# Altium PCB AIR_SENSE.PcbDoc
Units mm, origin at the board's own origin, x right, y up, seen from the top; angles counter-clockwise.
Board outline 108 x 60 mm, 2 copper layers (Top, Bottom), stack 1.471 mm thick; 19 components, 15 nets, 105 pads, 18 vias.
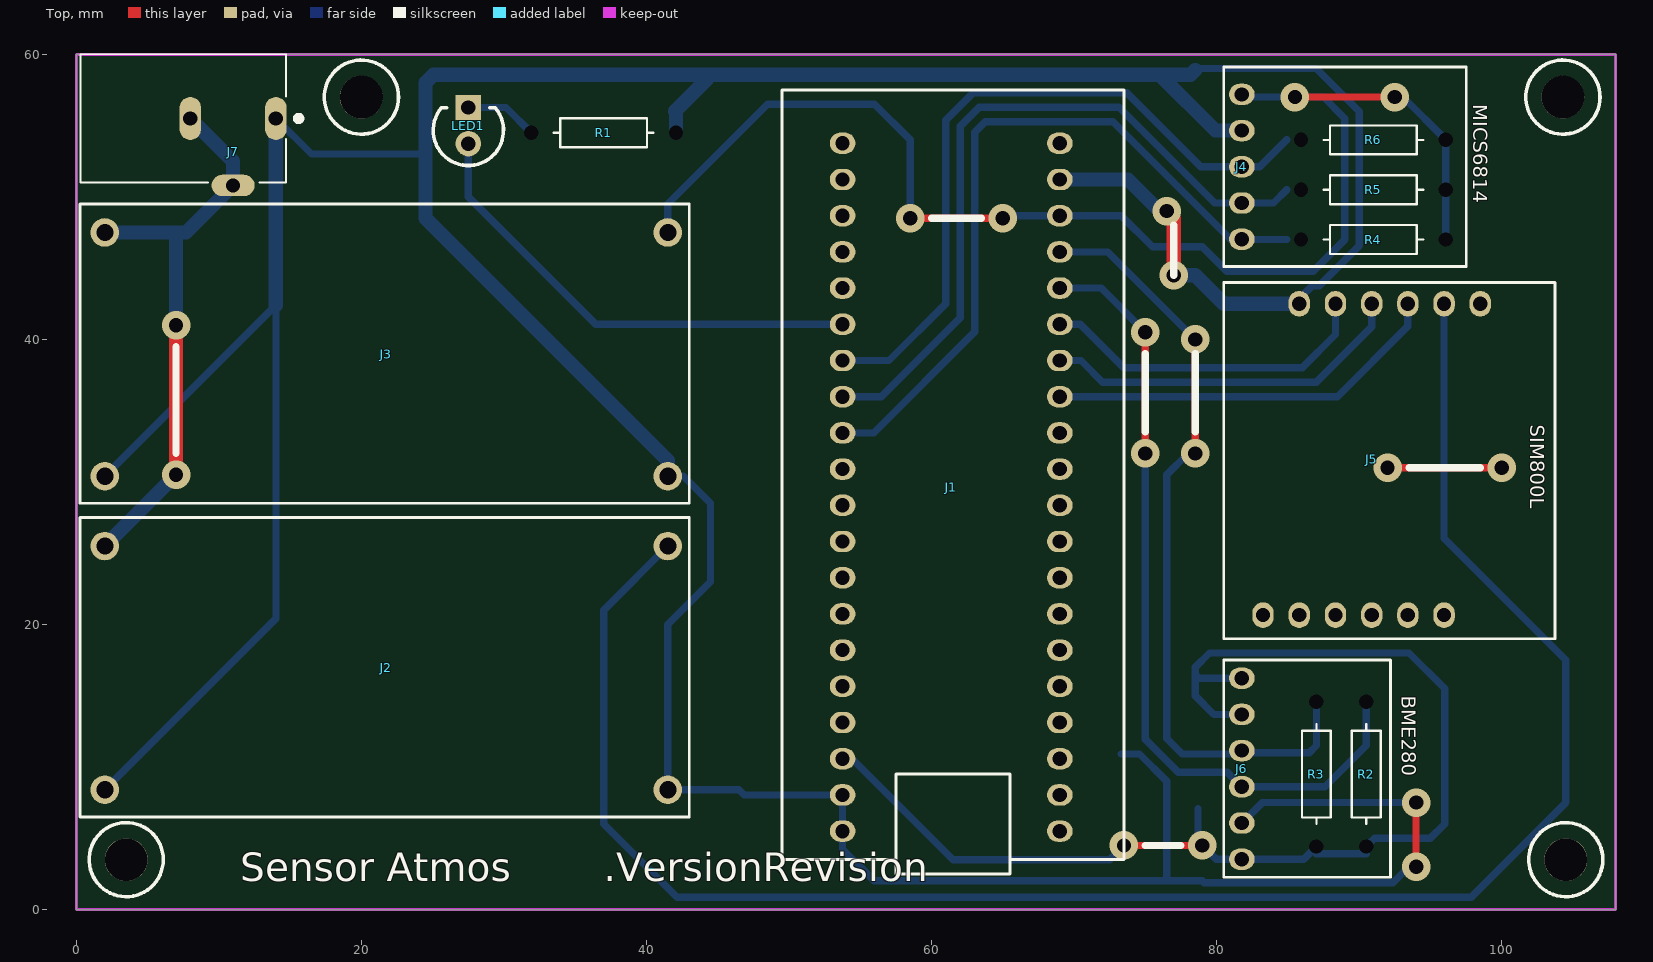
[diagram p0: Top view]
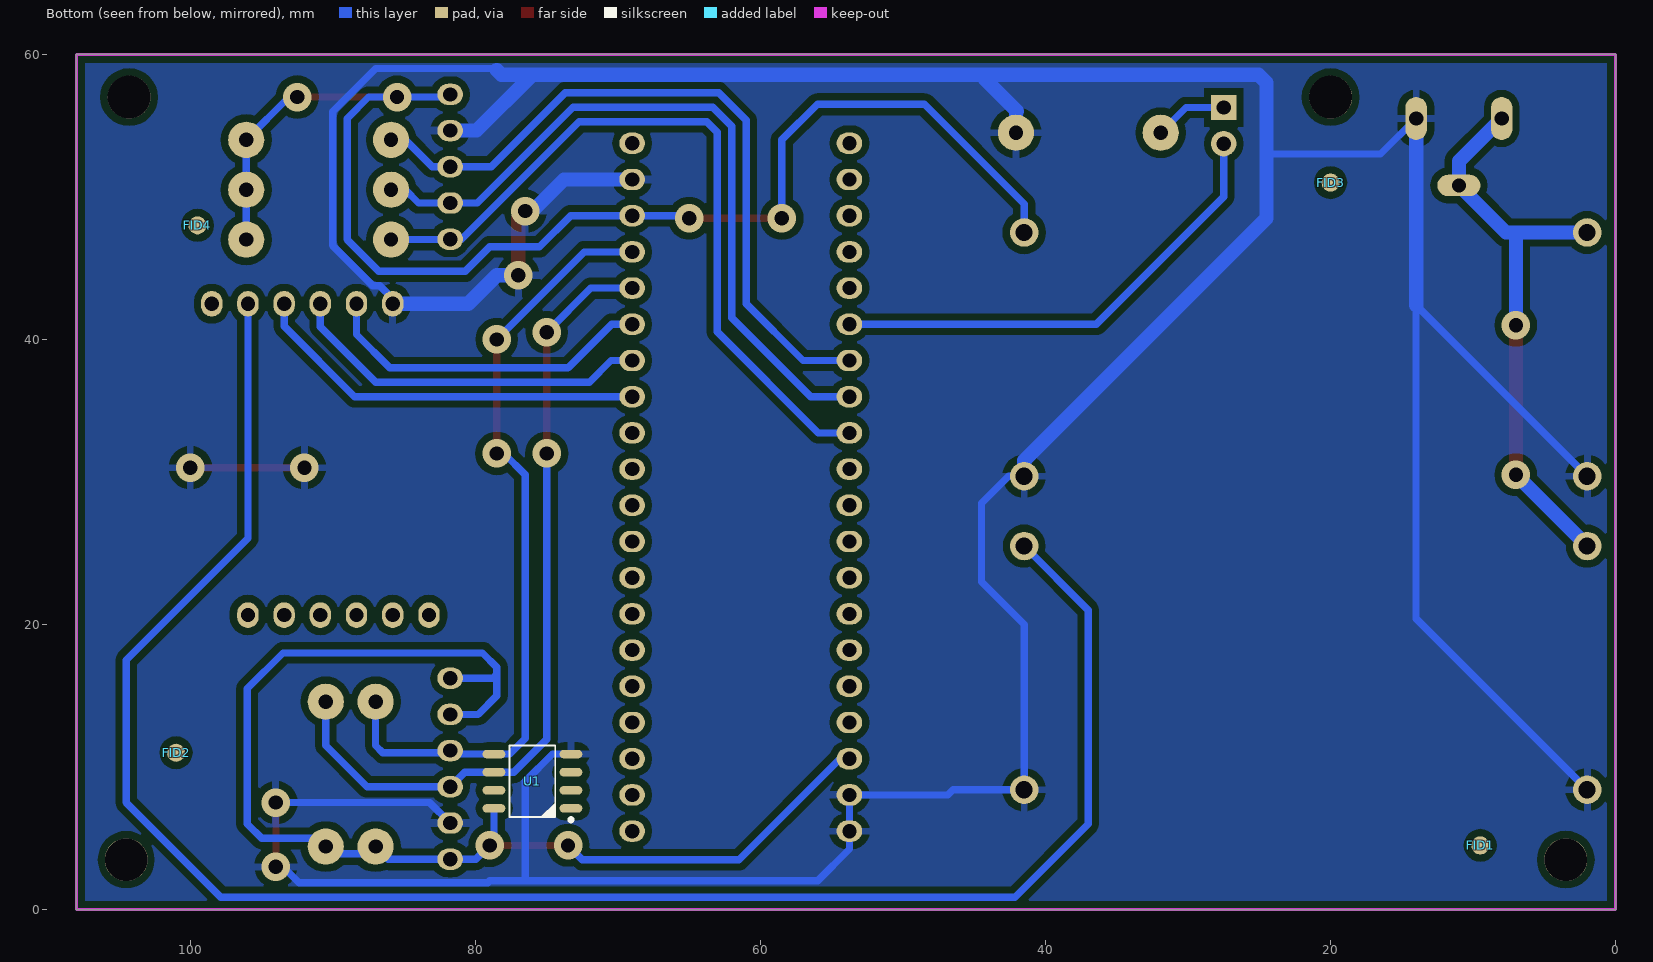
[diagram p1: Bottom view, seen from below]

## Layer stack, top to bottom
Top Solder: solder mask 0.0102, Solder Resist, Dk 3.5
Top: signal copper 0.0356
Dielectric1: dielectric 1.4, FR-4, Dk 4.8
Bottom: signal copper 0.0356
Bottom Solder: solder mask 0.0102, Solder Resist, Dk 3.5

## Board outline
0,0 108,0 108,60 0,60

## Design rules (kind name [scope] priority, off if disabled: settings)
Clearance [All] p1: gap=0.508
HoleSize [All] p1: absolutevalues=TRUE maxlimit=5 minlimit=1 maxpercent=80.000 minpercent=20.000
PolygonConnect [All] p1: connectstyle=Relief reliefconductorwidth=0.508 reliefentries=4 polygonreliefangle="90 Angle" airgapwidth=0.508
RoutingVias [All] p1: holewidth=0.711 width=1.27 viastyle="Through Hole" minholewidth=0.711 minwidth=1.27 maxholewidth=0.711 maxwidth=1.27
SilkToSolderMaskClearance SilkscreenOverComponentPads [IsPad] p1: minsilkscreentomaskgap=0 clearancetoexposedcopper=TRUE
SolderMaskExpansion [All] p1: expansion=0.102
Width [All] p1: maxlimit=2 minlimit=0.254 preferedwidth=1
28 further rules are at their usual default settings.

## Components (designator, comment, footprint, x,y, rotation, side; value= is the part's Value field where it differs from the comment)
FID1 "FIDUCIAL" "FIDUCIAL - 1.27mm" 9.5,4.5 r90 bottom
FID2 "FIDUCIAL" "FIDUCIAL - 1.27mm" 101,11 r90 bottom
FID3 "FIDUCIAL" "FIDUCIAL - 1.27mm" 20,51 r90 bottom
FID4 "FIDUCIAL" "FIDUCIAL - 1.27mm" 99.5,48 r90 bottom
J1 "MODULE BLUE PILL SOCKET" "MODULE BLUE PILL SOCKET" 69,5.5 r90 top
J2 "XL6009" "MODULE DC-DC XL6009 SOCKET" 2,25.5 r0 top
J3 "XL6009" "MODULE DC-DC XL6009 SOCKET" 2,47.5 r0 top
J4 "MODULE MICS6814 SOCKET" "MODULE MICS6814 SOCKET" 80.5,61 r0 top
J5 "MODULE SIM800L SOCKET" "MODULE SIM800L SOCKET" 98.5,42.5 r270 top
J6 "Socket" "MODULE BME280 SOCKET" 80.5,17.5 r0 top
J7 "PJ-102BH" CUI_PJ-102BH 7.5,55.5 r180 top
LED1 "LED_RED_3MM_PTH" LED-3MM-RED 27.5,55 r0 top
R1 "Carbon Film" RESTH_AXIAL-0.4 37,54.5 r180 top
R2 "Carbon Film" RESTH_AXIAL-0.4 90.5,9.5 r270 top
R3 "Carbon Film" RESTH_AXIAL-0.4 87,9.5 r270 top
R4 "Carbon Film" RESTH_AXIAL-0.4 91,47 r0 top
R5 "Carbon Film" RESTH_AXIAL-0.4 91,50.5 r0 top
R6 "Carbon Film" RESTH_AXIAL-0.4 91,54 r0 top
U1 "Authentication Chip" SOIC127P600X175-8AN 76,9 r0 bottom

## Footprints (in the part's own frame and the unit in brackets; to place one, negate y for a bottom-side part, rotate by r counter-clockwise, add the part's x,y. Pads: shape width x height; smd on the part's side, far side on the other; paste and mask are expansions set on the pad)
CUI_PJ-102BH [mm]
  oval 1.508x3.016 hole 1: 1(-6.5,0) 2(-0.5,0)
  oval 3.016x1.508 hole 1: 3(-3.5,4.7)
  silkscreen extent -8.3,-4.5 7.2,4.5, body extent -7.2,-4.5 7.2,4.9, height 11.5
"FIDUCIAL - 1.27mm" [mm]
  round 1.27 smd: Fiducial(0,0)
LED-3MM-RED [mil] "LED 3MM PTH"
  round 70 hole 39.37: A(0,-50)
  rect 70x70 hole 39.37: K(0,50)
  silkscreen extent -97,-110 97,49, body extent -65,-66 65,61, height 196
"MODULE BLUE PILL SOCKET" [mm]
  oval 1.5x1.8 hole 1: 1(0,0) 2(2.54,0) 3(5.08,0) 4(7.62,0) 5(10.16,0) 6(12.7,0) 7(15.24,0) 8(17.78,0) 9(20.32,0) 10(22.86,0) 11(25.4,0) 12(27.94,0) 13(30.48,0) 14(33.02,0) 15(35.56,0) 16(38.1,0) 17(40.64,0) 18(43.18,0) 19(45.72,0) 20(48.26,0) 21(48.26,15.24) 22(45.72,15.24) 23(43.18,15.24) 24(40.64,15.24) 25(38.1,15.24) 26(35.56,15.24) 27(33.02,15.24) 28(30.48,15.24) 29(27.94,15.24) 30(25.4,15.24) 31(22.86,15.24) 32(20.32,15.24) 33(17.78,15.24) 34(15.24,15.24) 35(12.7,15.24) 36(10.16,15.24) 37(7.62,15.24) 38(5.08,15.24) 39(2.54,15.24) 40(0,15.24)
  silkscreen extent -3,-4.5 52,19.5, body extent -3.43,-3.81 54.13,19.05, height 20.77
"MODULE BME280 SOCKET" [mm]
  oval 1.8x1.5 hole 1: 1(1.27,-1.27) 2(1.27,-3.81) 3(1.27,-6.35) 4(1.27,-8.89) 5(1.27,-11.43) 6(1.27,-13.97)
  silkscreen extent 0,-15.24 11.7,0, body extent 0,-15.42 11.5,0.12, height 14.1
"MODULE DC-DC XL6009 SOCKET" [mm]
  round 2 hole 1.2: 1(0,0) 2(0,-17.1) 3(39.5,-17.1) 4(39.5,0)
  silkscreen extent -1.75,-19 41,2, body extent -1.81,-19.11 41.37,1.97, height 21.25
"MODULE MICS6814 SOCKET" [mm] "GAS SENSOR BREAKOUT BOARD"
  oval 1.8x1.5 hole 1: 1(1.27,-13.97) 2(1.27,-11.43) 3(1.27,-8.89) 4(1.27,-6.35) 5(1.27,-3.81)
  silkscreen extent 0,-15.89 17.02,-1.89, body extent 0.02,-15.89 17.02,-1.89, height 14.1
"MODULE SIM800L SOCKET" [mm] "GSM GRPS MODULE BREAKOUT BOARD"
  oval 1.8x1.5 hole 1: 1(0,0) 2(0,-2.54) 3(0,-5.08) 4(0,-7.62) 5(0,-10.16) 6(0,-12.7) 7(21.844,-15.24) 8(21.844,-12.7) 9(21.844,-10.16) 10(21.844,-7.62) 11(21.844,-5.08) 12(21.844,-2.54)
  silkscreen extent -1.5,-18 23.5,5.25, body extent -1.51,-17.94 23.49,5.19, height 15.6
RESTH_AXIAL-0.4 [mm]
  round 0 / inner round 0 / far side round 2.54 hole 1 unplated: 1(-5.08,0) 2(5.08,0)
  silkscreen extent -3.5,-1.02 3.5,1.02, body extent -5.38,-1.28 5.38,1.28, height 2.6
SOIC127P600X175-8AN [mm]
  round 1 on Mech15: 0(0,0)
  oval 1.6x0.6 smd: 1(-2.7,1.905) 2(-2.7,0.635) 3(-2.7,-0.635) 4(-2.7,-1.905) 5(2.7,-1.905) 6(2.7,-0.635) 7(2.7,0.635) 8(2.7,1.905)
  silkscreen extent -2.82,-2.5 1.6,2.82, body extent -3,-2.45 3,2.45, height 1.75

## Part data
J2 J3: library part "MODULE DC-DC XL6009 SOCKET"
J6: library part "MODULE BME280 SOCKET", "CONN HEADER FEMALE 6POS .1\" GOLD"
J7: "CONN PWR JACK 2.5X5.5MM SOLDER"
LED1: "LED RED 650NM 3MM RND"
R1 R2 R3 R4 R5 R6: library part RES_12K_Axial_0.25W_5%, "Resistor THD Axial 12k Ohm 0.25W 5% Carbon Film"
U1: library part ATECC608, "Authentication Chip IC Networking and Communications 8-SOIC"

## Free pads (board coordinates)
  round 3 hole 3: 1(3.5,3.5) 1(20,57) 1(104.3,57) 1(104.5,3.5)

## Via types
v1: diameter 2, hole 1, Top to Bottom, 18 vias

## Nets (pads, with @x,y where several pads share a name; then routed paths per layer and width w, separated by ;. In a path a pad name is that pad's centre, name@x,y a point inside that pad or via, vN(x,y) a via of type N, cw(c..) or ccw(c..) an arc to the next point about the centre after c; other vN are vias at no path point)
CO_VALUE: J1.29 J4.1 R4.1 | length 51.8
  Bottom w0.508: J1.29 55.94,33.44 63.032,40.532 63.032,54.532 63.772,55.272 72.728,55.272 80.97,47.03 J4.1 81.8,47 R4.1@84.92,47
GND: J1.19 J1.39 J1.40 J2.2 J2.3 J3.2 J3.3 J4.4 J5.6 J6.5 J7.1 R1.1 U1.4 | length 352.6
  Top w0.508: v1(92,31) v1(100,31) ; v1(94,3) v1(94,7.5)
  Top w1: v1(76.5,49) 77,48.5 v1(77,44.5)
  Bottom w0.508: J2.2 14,20.4 14,42.4 J3.2 ; J7.1 16.5,53 24.25,53 24.5,53.25 ; J3.3 42.6,30.4 44.5,28.5 44.5,23 41.5,20 J2.3 46.5,8.4 46.86,8.04 J1.39 J1.40 53.76,4.24 55.982,2.018 76.5,2.018 ; 43.934,58.566 44.25,58.25 ; U1.4 74.595,10.905 76.5,9 76.5,2.018 ; 78.5,59 87,59 90.016,55.984 90.016,46.579 87.206,43.769 86.706,43.769 85.8,42.863 J5.6 ; J6.5 83.2,7.5 v1(94,7.5) ; v1(94,3) 93.5,3 92.378,1.878 79.14,1.878 79,2.018 76.5,2.018
  Bottom w1: 14,42.4 J7.1 ; J3.3 41.5,31.5 24.5,48.5 24.5,53.25 24.5,58 25.066,58.566 43.934,58.566 76,58.566 ; R1.1 42.08,55.92 42,56 44.25,58.25 ; J1.19 73.78,51.22 76,49 v1(76.5,49) ; v1(77,44.5) 78.5,44.5 80.5,42.5 J5.6 ; 78.5,58.892 78.174,58.566 76,58.566 ; J4.4 79.916,54.65 76,58.566
I2C_SCL: J1.16 J6.4 R2.1 U1.6 | length 56.5
  Top w0.508: v1(75,32) v1(75,40.5)
  Bottom w0.508: J1.16 71.9,43.6 v1(75,40.5) ; v1(75,32) 75,11.937 77.302,9.635 U1.6 80.745,9.635 J6.4 87.61,8.61 90.5,11.5 R2.1@90.5,14.08
I2C_SDA: J1.17 J6.3 R3.1 U1.5 | length 55.1
  Top w0.5: v1(78.5,32) v1(78.5,40)
  Bottom w0.5: J1.17 72.36,46.14 v1(78.5,40) ; v1(78.5,32) 78,32 76.5,30.5 76.5,12 77.595,10.905 U1.5 81.525,10.905 J6.3 81.92,11 86.5,11 87,11.5 R3.1@87,14.08
NetLED1_K: LED1.K R1.2 | length 5.2
  Bottom w0.508: LED1.K 30.15,56.27 R1.2
NH3_VALUE: J1.28 J4.2 R5.1 | length 50.6
  Bottom w0.508: J1.28 56.48,35.98 62.016,41.516 62.016,54.953 63.351,56.288 73.149,56.288 79.867,49.57 J4.2 83.99,49.57 R5.1@84.92,50.5
NO2_VALUE: J1.27 J4.3 R6.1 | length 49.4
  Bottom w0.508: J1.27 57.02,38.52 61,42.5 61,55.374 62.93,57.304 73.696,57.304 78.89,52.11 J4.3 83.03,52.11 R6.1@84.92,54
PWM_1: J1.26 LED1.A | length 33.7
  Bottom w0.508: LED1.A 27.5,50 36.44,41.06 J1.26
SIM800_RST: J1.13 J5.3 | length 28
  Bottom w0.508: J1.13 88.48,35.98 93.42,40.92 J5.3
SIM800_RXD: J1.14 J5.4 | length 25.7
  Bottom w0.508: J1.14 70.48,38.52 72.004,36.996 86.996,36.996 90.88,40.88 J5.4
SIM800_TXD: J1.15 J5.5 | length 23.7
  Bottom w0.5: J1.15 70.44,41.06 73.492,38.008 86.008,38.008 88.34,40.34 J5.5
VCC3V3: J1.38 J6.1 J6.2 J6.6 R2.2 R3.2 U1.8 | length 87.4
  Top w0.508: v1(73.5,4.5) v1(79,4.5)
  Bottom w0.508: J1.38 54.42,10.58 61.5,3.5 72.5,3.5 v1(73.5,4.5) ; U1.8 78.7,4.8 v1(79,4.5) 79.97,3.53 J6.6 86.11,3.53 R3.2 ; J6.2 79.81,13.69 78.5,15 78.5,16.5 ; J6.1 78.77,16.23 78.5,16.5 ; R3.2@87,3.92 R2.2@90.5,3.92 ; R2.2 91.08,5 95,5 96,6 96,15.5 93.5,18 79.5,18 78.5,17 78.5,16.5
VCC4V0: J2.4 J5.2 | length 132.3
  Bottom w0.508: J2.4 37,21 37,6 42.138,0.862 97.862,0.862 104.5,7.5 104.5,17.5 95.96,26.04 J5.2
VCC5V0: J1.18 J3.4 J4.5 R4.2 R5.2 R6.2 | length 97
  Top w0.508: v1(58.5,48.5) v1(65,48.5) ; v1(85.5,57) 92.12,57 92.31,57.19 v1(92.5,57)
  Bottom w0.508: J3.4 41.5,49.5 48.5,56.5 56,56.5 58.5,54 v1(58.5,48.5) ; v1(65,48.5) 65.5,48.5 65.68,48.68 J1.18 73.32,48.68 75.5,46.5 79,46.5 80.715,44.785 86.785,44.785 89,47 89,55.5 87.5,57 v1(85.5,57) 81.96,57 J4.5 ; v1(92.5,57) 93.08,57 R6.2 R5.2 R4.2
VIN: J2.1 J3.1 J7.2 J7.3 | length 40.4
  Top w1: v1(7,30.5) v1(7,41)
  Bottom w1: J2.1 v1(7,30.5) ; J3.1 7,47.5 ; v1(7,41) 7,47.5 ; J7.2 11,52.5 J7.3 7.7,47.5 7,47.5
pads on no net: FID1.Fiducial FID2.Fiducial FID3.Fiducial FID4.Fiducial J1.1 J1.2 J1.3 J1.4 J1.5 J1.6 J1.7 J1.8 J1.9 J1.10 J1.11 J1.12 J1.20 J1.21 J1.22 J1.23 J1.24 J1.25 J1.30 J1.31 J1.32 J1.33 J1.34 J1.35 J1.36 J1.37 J5.1 J5.7 J5.8 J5.9 J5.10 J5.11 J5.12 U1.0 U1.1 U1.2 U1.3 U1.7

## Polygon pours and split planes (outlines as drawn)
GND on Bottom "GND" (solid, pour order 0): 0,60 108,60 108,0 0,0

## Keep-outs
Keep-Out Layer:
  the board outline again, w0.2

## Silkscreen, mask and mechanical layers (free items; w line width, h text height)
Top Overlay:
  circle w0.254: c104.5,3.5 r2.6
  circle w0.254: c104.3,57 r2.6
  circle w0.254: c20,57 r2.6
  circle w0.254: c3.5,3.5 r2.6
  lines w0.508: 7,32 7,39.5 ; 60,48.5 63.5,48.5 ; 75,4.5 77.5,4.5 ; 75,33.5 75,39 ; 77,44.5 77,48 ; 78.5,33.5 78.5,39 ; 93.5,31 98.5,31
  text "Sensor Atmos" at 11.5,2 h2
  text ".VersionRevision" at 37,2 h2
Notas de Fab 4:
  text "Observacoes para producao desta PCI:" at 117.287,69.61 h1.44
  text "- O substrato da PCI dever ser FR-4 com 1.4mm de espessura" at 117,66 h1.44
  text "- A Legenda do TOP deve ser branco" at 118.222,63.081 h1.44
  text "Gerbers:" at 118.087,49.76 h1.52
  text "*.GTO - Top Overlay" at 118.087,47.26 h1.52
  text "*.GTP - Top Paste" at 118.087,44.76 h1.52
  text "*.GTS - Top Solder" at 118.087,42.26 h1.52
  text "*.GTL - Top Layer" at 118.087,39.72 h1.52
  text "*.GBL - Bottom Layer" at 118.087,37.02 h1.52
  text "*.GBS - Bottom Solder" at 118.087,34.52 h1.52
  text "*.GBP - Bottom Paste" at 118.087,32.02 h1.52
  text "*.GBO - Bottom Overlay" at 118.087,29.56 h1.52
  text "*.GM4 - Notas de fabricacao" at 118.087,26.96 h1.52
  text "*.GM14 - Contorno da PCI" at 118.087,24.46 h1.52
  text "*.GM32 - Medidas" at 118.087,21.86 h1.52
  text ".Project" at 118.267,10.081 h3
  text "Versao da placa:" at 118.293,6.191 h1.52
  text ".VersionRevision" at 143.092,6.143 h1.52
  text "Contato:" at 118.347,3.053 h1.52
  text "jpnogg@gmail.com" at 121.093,0.291 h1.52
Medidas 32:
  circle w0.254: c3.5,3.5 r1.5
  circle w0.254: c104.5,3.5 r1.5
  circle w0.254: c104.3,57 r1.5
  circle w0.254: c20,57 r1.5
  lines w0.2: 0,0 0,60 108,60 108,0 0,0

## Dimensions
20,57 to 3.5,3.5 on Mechanical 16
104.5,3.5 to 104.3,57 on Mechanical 16
104.5,3.5 to 3.5,3.5 on Mechanical 16
20,57 to 104.3,57 on Mechanical 16
0,0 to 0,60 on Mechanical 16
0,0 to 108,0 on Mechanical 16

## Text inside footprints (layer, text, board x,y; h text height)
J4: Top Overlay "MICS6814" at 98,56.5 h1 r270
J5: Top Overlay "SIM800L" at 102,34 h1 r270
J6: Top Overlay "BME280" at 93,15 h1 r270